# Altium PCB Controlador_BombaDeAgua(analogico).PcbDoc
Units mm, origin at the board's own origin, x right, y up, seen from the top; angles counter-clockwise.
Board outline 68.4 x 34.5 mm, 2 copper layers (Top Layer, Bottom Layer); 17 components, 9 nets, 38 pads, 0 vias.
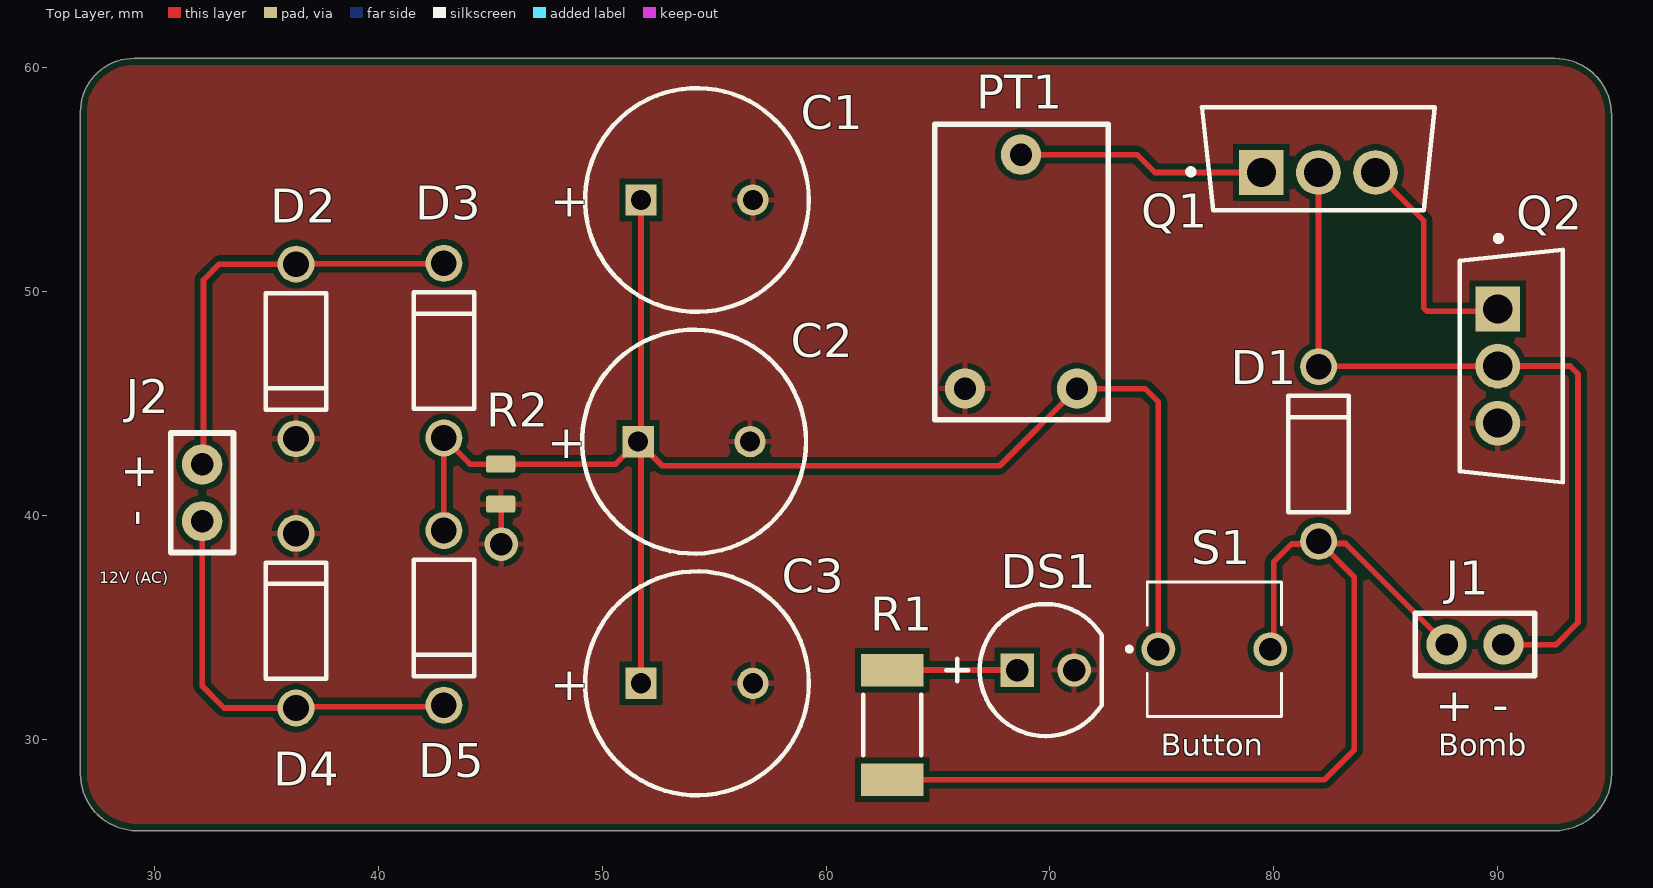
[diagram p0: Top Layer view]
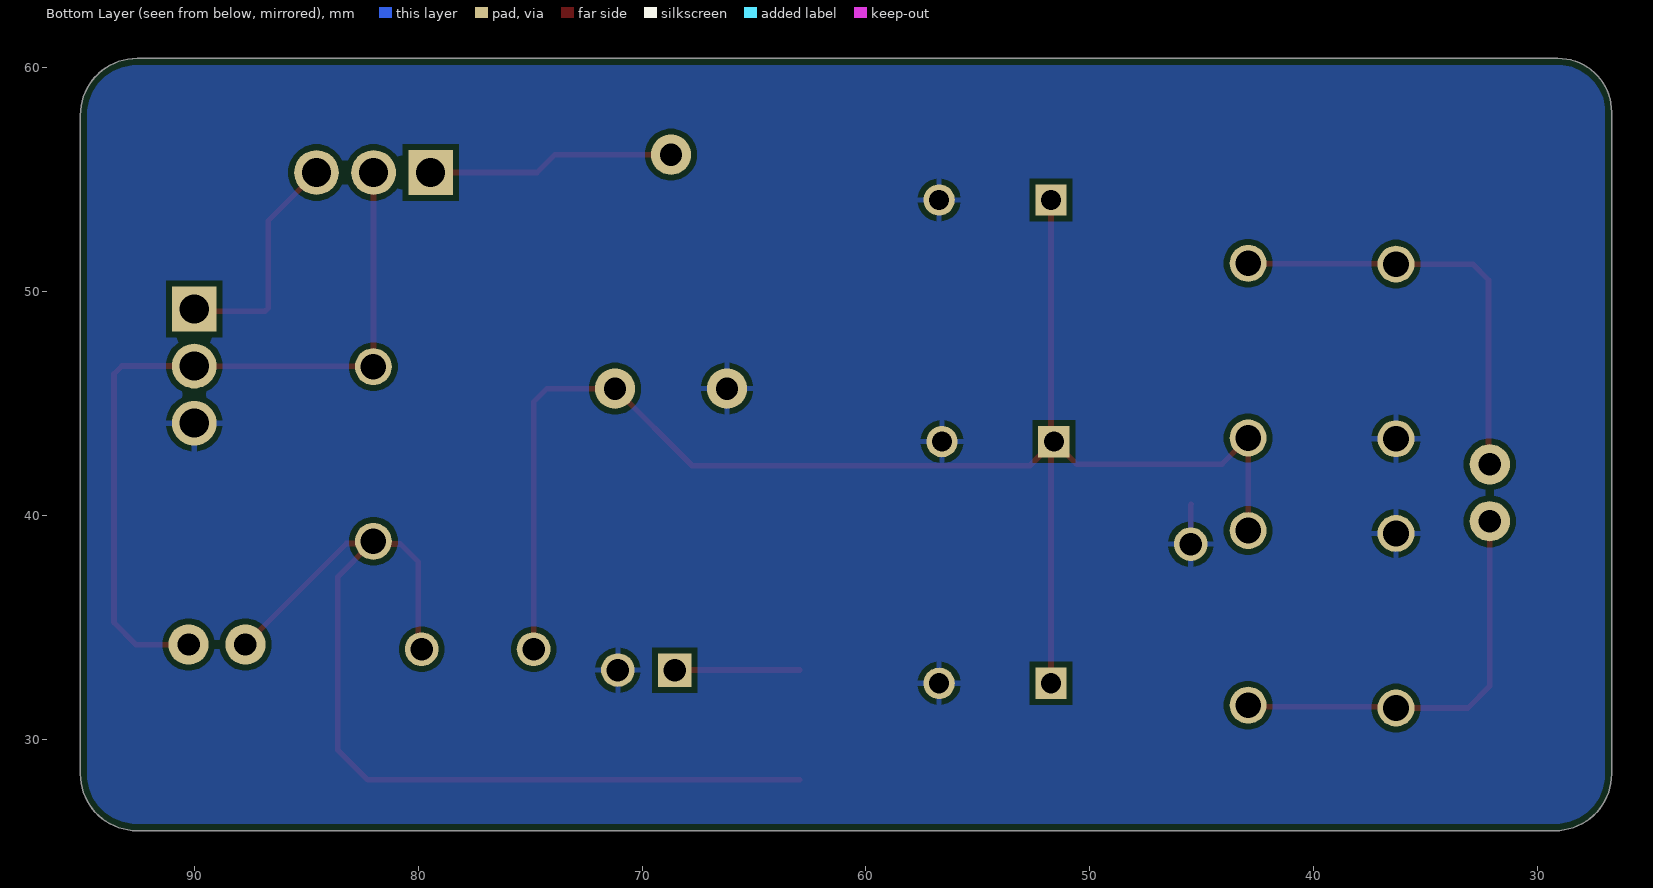
[diagram p1: Bottom Layer view, seen from below]

## Layer stack, top to bottom
Top Solder: solder mask 0.0102, Solder Resist, Dk 3.5
Top Layer: signal copper 0.0356
Dielectric 1: dielectric 0.32, FR-4, Dk 4.8
Bottom Layer: signal copper 0.0356
Bottom Solder: solder mask 0.0102, Solder Resist, Dk 3.5

## Board outline
92.549,25.927 ccw(c92.549,28.467) 95.089,28.467 95.089,57.887 ccw(c92.549,57.887) 92.549,60.427 29.089,60.427 ccw(c29.089,58.027) 26.689,58.027 26.689,28.467 ccw(c29.229,28.467) 29.229,25.927 43.289,25.927

## Design rules (kind name [scope] priority, off if disabled: settings)
BoardOutlineClearance [All] p1: gap=0.254 ignorepadtopadclearanceinfootprint=FALSE except(0: Arc-SplitContinuation Track-SplitContinuation SMDPad-SplitContinuation THPad-SplitContinuation Via-SplitContinuation Fill-SplitContinuation Poly-SplitContinuation Region-SplitContinuation Text-SplitContinuation; 0.3: Track-OutlineEdge THPad-OutlineEdge Via-OutlineEdge Poly-OutlineEdge)
Clearance [All] p1: gap=0.254 ignorepadtopadclearanceinfootprint=FALSE
PolygonConnect [All] p1: connectstyle=Relief reliefconductorwidth=0.254 reliefentries=4 polygonreliefangle="90 Angle" airgapwidth=0.254
RoutingVias [All] p1: holewidth=0.711 width=1.27 viastyle="Through Hole" minholewidth=0.711 minwidth=1.27 maxholewidth=0.711 maxwidth=1.27
SolderMaskExpansion [All] p1: expansion=0.102 istentingtop=FALSE
SupplyNets "Schematic Supply Nets" [InNet('GND')] p1: voltage=0.000
Width [All] p1: maxlimit=0.254 minlimit=0.254 preferedwidth=0.254
30 further rules are at their usual default settings.

## Components (designator, comment, footprint, x,y, rotation, side; value= is the part's Value field where it differs from the comment)
C1 "ECA1EM102" CAPPR65-500-2000X1000X2200 54.229,54.102 r0 top value=1mF
C2 "ECA1EM102" CAPPR65-500-2000X1000X2200 54.102,43.307 r0 top value=1mF
C3 "ECA1EM102" CAPPR65-500-2000X1000X2200 54.229,32.512 r0 top value=1mF
D1 "1N4007" FAIR-DO-41-2 82,42.754 r90 top
D2 "1N4007" FAIR-DO-41-2 36.322,47.334 r270 top
D3 "1N4007" FAIR-DO-41-2 42.926,47.371 r90 top
D4 "1N4007" FAIR-DO-41-2 36.322,35.306 r90 top
D5 "1N4007" FAIR-DO-41-2 42.926,35.433 r270 top
DS1 "G502DC" CGX-G502DC 69.808,33.102 r0 top
J1 "Bomba" "HEADER 2" 87.715,34.245 r0 top
J2 "Trafo" "HEADER 2" 32.131,42.291 r270 top
PT1 "Potenciômetro" "POTENCIôMETRO 10K" 71.205,45.675 r180 top
Q1 "TIP31C" FP-TO-220-P0A0015988-MFG 81.99,55.935 r90 top
Q2 "TIP31C" FP-TO-220-P0A0015988-MFG 90.609,46.681 r0 top
R1 "270R" RESC2010(5025)_M 62.95,30.652 r90 top value="270.00 Ohm"
R2 "CMP-009-00016-5" RESC0805(2012)_L 45.466,41.402 r270 top value=10k
S1 "BUTT-2" SW_BUTT-2 77.343,34.036 r0 top

## Footprints (in the part's own frame and the unit in brackets; to place one, negate y for a bottom-side part, rotate by r counter-clockwise, add the part's x,y. Pads: shape width x height; smd on the part's side, far side on the other; paste and mask are expansions set on the pad)
CAPPR65-500-2000X1000X2200 [mm] "THD, 2-Leads, Dia 10mm, Pin Spacing 5mm"
  rect 1.4x1.4 hole 0.9: 1(-2.5,0)
  round 1.4 hole 0.9: 2(2.5,0)
  silkscreen extent -5,-5 5,5, body extent -5,-5 4.95,5, height 22
CGX-G502DC [mm] "THD, 2-Leads, Dia 5.9mm, Pin Spacing 2.54mm"
  rect 1.5x1.5 hole 1: 1(-1.27,0)
  round 1.5 hole 1: 2(1.27,0)
  silkscreen extent -4.45,-2.95 2.5,2.95, body extent -2.95,-2.95 2.5,2.95, height 9.1
FAIR-DO-41-2 [mm] "THD, 2-Leads, Body 5.2x2.72mm, Pin Spacing 7.8mm"
  round 1.65 hole 1.15: 1(-3.9,0) 2(3.9,0)
  silkscreen extent -2.6,-1.35 2.6,1.35, body extent -4.29,-1.17 4.29,1.17, height 2.35
FP-TO-220-P0A0015988-MFG [mm]
  rect 2x2 hole 1.3 paste-2539.97 mask+0: 1(-0.607,2.55)
  round 2 hole 1.3 paste-2539.97 mask+0: 2(-0.607,0) 3(-0.607,-2.55)
  silkscreen extent -2.3,-5.2 2.3,5.82, body extent -2.4,-5.3 2.4,5.3, height 0.25
"HEADER 2" [mm]
  round 1.8 hole 1: 0(0,0) 1(2.54,0)
  silkscreen extent -1.4,-1.4 3.94,1.4, body extent -1.27,-1.27 3.81,1.27, height 8.89
"POTENCIôMETRO 10K" [mm]
  round 1.8 hole 1: 1(0,0) 2(5,0) 3(2.5,-10.452)
  silkscreen extent -1.4,-11.81 6.35,1.4, body extent -2.03,-10.63 6.97,1.27, height 6.55
RESC0805(2012)_L [mm] "Chip Resistor, Body 2.0x1.3mm, IPC High Density"
  rrect25% 0.76x1.3 smd: 1(-0.9,0) 2(0.89,0)
  body extent -1,-0.62 1,0.63, height 0.6
RESC2010(5025)_M [mm] "Chip Resistor, Body 5.0x2.5mm, IPC Low Density"
  rect 1.45x2.8 smd: 1(-2.45,0) 2(2.45,0)
  silkscreen extent -1.35,-1.3 1.35,1.3, body extent -2.6,-1.35 2.6,1.35, height 0.71
SW_BUTT-2 [mm]
  round 1.508 hole 1: 1(-2.5,0) 2(2.5,0)
  silkscreen extent -3.9,-3 3,3

## Part data
C1 C2 C3: library part CMP-001-00023-8, "Aluminum Electrolytic Capacitor, 1000 uF, +/- 20%, 25 V, -40 to 85 degC, 2-Pin THD, RoHS, Bulk", Capacitor Type=Electrolytic, Case/Package=Radial, Manufacturer=Panasonic, Max Operating Temperature=85°C, Min Operating Temperature=-40°C, Package Description="2-Pin Radial Lead, Dia 10 mm, Height 22 mm", Package Quantity=200, Package Reference=CAPPR65-500-2000X1000X2200, Ripple Current=850mA, Tolerance=20%, Voltage Rating=25V, Datasheet URL=https://industrial.panasonic.com/cdbs/www-data/pdf/RDF0000/ABA0000C1218.pdf, Datasheet Version="Rev. 05, 10/2016", Diameter=10mm, Lead Pitch=5mm, Manufacturer URL=http://www.panasonic.com/, Mounting Technology=TH, Packaging=Bulk, RoHS Compliant=True
D1 D2 D3 D4 D5: library part CMP-004-00007-2, "General Purpose Rectifier, 1.1 V, 1.0 A, -55 to 175 degC, 2-Pin DO-41, RoHS, Tape and Reel", Case/Package=DO-41-2, Forward Current=1A, Forward Voltage=1.1V, Manufacturer=Fairchild, Max Operating Temperature=175°C, Max Surge Current=30A, Min Operating Temperature=-55°C, Package Description="2-Pin Axial Lead, Dia 2.375 mm, Body Length 4.63 mm", Package Quantity=5000, Package Version="Rev. 2, 09/2008", Peak Reverse Current=5uA, Datasheet URL=https://www.fairchildsemi.com/datasheets/1N/1N4007.pdf, Datasheet Version="Rev. 1.1.0, 11/2014", Elements=1, Manufacturer URL=https://www.fairchildsemi.com/, Mounting Technology=TH, Package Reference=DO-41-2, Package URL=http://www.fairchildsemi.com/dwg/DO/DO41A.pdf, Packaging=TapeandReel, Pins=2, RoHS Compliant=True
DS1: library part CMP-007-00008-2, "Green LED, 80 mW, 20 mA, -25 to 85 degC, 2-Pin THD", Manufacturer="Shenzhen CGX", Package Description="2-Pin Through Hole Device, Dia 5.9 mm", Case/Package=G502DC, Datasheet URL=http://datasheet.octopart.com/G502DC-Chengguangxing-datasheet-62330340.pdf, Datasheet Version=Sep-14, Manufacturer URL=http://szcgx.com/, Mounting Technology=TH, Package Reference=G502DC, RoHS Compliant=Unknown
J1 J2: library part CMP-040-000034-1, Design Item ID="Header 2", Source=FIFILIB.SchLib
PT1: library part CMP-040-000215-1, Design Item ID=Potenciômetro, Source=TROIA2.2.SchLib
Q1 Q2: library part CMP-12195-000001-1, "TRANS NPN 100V 3A TO-220", Collector Base Voltage=100V, Collector Emitter Saturation Voltage=1.2V, Emitter Base Voltage=5V, Manufacturer=STMicroelectronics, Max Collector Current=3A, Max Junction Temp=+150°C, Package=TO-220-P0A0015988, Power Dissipation=2W, Temperature="to +150°C", Automotive=No, Category=Trans, Collector Emitter Voltage=100V, ComponentLink2Description=Datasheet, ComponentLink2URL=https://www.st.com/resource/en/datasheet/tip31c.pdf, Device Class L1="Discrete Semiconductors", Device Class L2=Transistors, Device Class L3=BJTs, Digikey Description="TRANS NPN 100V 3A TO-220", Height=19.68mm, Hfe Max=50, hFE Min=10, Hfe Testic=3A, Hfe Testvce=4V, Lead Free=Yes, Manufacturer Part Number=TIP31C, Mouser Description="Bipolar Transistors - BJT NPN Gen Pur Power", Number Of Elements=1, Number Of Npn=1, Octopart=https://octopart.com/tip31c-stmicroelectronics-15555, RoHS=TRUE, Standoff Height=3.5mm, Temperature Range High=+150°C
R1: library part CMP-1017-00444-1, "270R 0.75W 1% 2010 (5025 Metric)  SMD", Case-EIA=2010, Case-Metric=5025, Power="0.75 W", Tolerance="1 %", Technology=SMT
R2: library part CMP-009-00318-1, "Chip Resistor, 10 KOhm, +/- 1%, 0.25 W, -55 to 155 degC, 1206 (3216 Metric)", Case/Package=1206, Max Operating Temperature=155°C, Min Operating Temperature=-55°C, Power=250mW, Tolerance=1%, Voltage Rating=200V, Available Preview Images=2D, Design Item ID=CMP-009-00016-5, Mounting Technology=SM, Pins=2, RoHS Compliant=True, Source="Components - 14.12.25 - 13.59.SchLib"
S1: library part CMP-011-00029-1, "Tactile Switches MINI PUSH BUTTON SWITCH 2-PIN QTY. 4", Case/Package=None, Availability="In Stock", Check_prices=https://www.snapeda.com/parts/BUTT-2/Gravitech/view-part/?ref=eda, Component Type=Standard, Design Item ID=BUTT-2, MF=Gravitech, MP=BUTT-2, Pins=2, Price=None, Purchase-URL=https://pricing.snapeda.com/search/part/BUTT-2/?ref=eda, SnapEDA_Link=https://www.snapeda.com/parts/BUTT-2/Gravitech/view-part/?ref=snap, Source=BUTT-2.SchLib

## Free pads (board coordinates)
  round 1.5 hole 1: ""(45.489,38.727)

## Nets (pads, with @x,y where several pads share a name; then routed paths per layer and width w, separated by ;. In a path a pad name is that pad's centre, name@x,y a point inside that pad or via, vN(x,y) a via of type N, cw(c..) or ccw(c..) an arc to the next point about the centre after c; other vN are vias at no path point)
GND: C1.2 C2.2 C3.2 D2.2 D4.2 DS1.2 pad. PT1.2 Q2.3 R2.2 | length 1.7
  Top Layer w0.254: R2.2 45.489,40.489 pad.@45.489,38.827
NetC1_1: C1.1 C2.1 C3.1 D3.1 D5.1 PT1.1 R2.1 S1.1 | length 71.6
  Top Layer w0.254: D5.1 D3.1 44.095,42.302 R2.1 50.597,42.302 C2.1 ; C3.1 C2.1@51.729,43.18 ; C1.1 51.729,43.434 C2.1 ; S1.1 74.843,45.073 74.241,45.675 PT1.1 67.756,42.226 52.683,42.226 C2.1@51.729,43.18 ; C2.1 C2.1@51.729,43.18
NetD1_1: D1.1 J1.0 R1.1 S1.2 | length 44.8
  Top Layer w0.254: R1.1 82.264,28.202 83.589,29.527 83.589,37.265 D1.1@82.1,38.754 ; S1.2 79.989,34.182 79.989,37.927 80.794,38.732 D1.1@81.878,38.732 ; D1.1 D1.1@82.1,38.754 ; J1.0 83.206,38.754 D1.1@82.1,38.754
NetD1_2: D1.2 J1.1 Q1.2 Q2.2 | length 35.3
  Top Layer w0.254: Q1.2 81.995,55.322 81.995,46.659 D1.2 82.014,46.668 89.988,46.668 Q2.2 93.235,46.681 93.589,46.327 93.589,35.227 92.589,34.227 90.273,34.227 J1.1
NetD2_1: D2.1 D3.2 J2.0 | length 19.3
  Top Layer w0.254: J2.0 32.189,42.349 32.189,50.527 32.896,51.234 D2.1 36.34,51.252 42.907,51.252 D3.2
NetD4_1: D4.1 D5.2 J2.1 | length 18.6
  Top Layer w0.254: J2.1 32.131,32.385 33.11,31.406 D4.1 36.386,31.47 42.862,31.47 D5.2
NetDS1_1: DS1.1 R1.2 | length 5.6
  Top Layer w0.254: R1.2 DS1.1
NetPT1_3: PT1.3 Q1.1 | length 11.1
  Top Layer w0.254: PT1.3 73.889,56.127 74.689,55.327 Q1.1
NetQ1_3: Q1.3 Q2.1 | length 10.4
  Top Layer w0.254: Q1.3 86.689,53.178 86.689,49.276 86.838,49.127 89.897,49.127 Q2.1

## Polygon pours and split planes (outlines as drawn)
GND on Bottom Layer "GND_L02_P003" (solid, remove dead copper, pour order 3): 93.889,60.727 cw(c93.889,59.227) 95.389,59.227 95.389,27.227 cw(c93.789,27.227) 93.789,25.627 93.489,25.654 27.686,25.654 cw(c27.686,26.924) 26.416,26.924 26.416,58.627 26.389,59.327 cw(c27.789,59.327) 27.789,60.727
GND on Top Layer "GND_L01_P002" (solid, remove dead copper, pour order 2): 93.889,60.727 cw(c93.889,59.227) 95.389,59.227 95.389,27.227 cw(c93.789,27.227) 93.789,25.627 93.489,25.654 27.686,25.654 cw(c27.686,26.924) 26.416,26.924 26.416,58.627 26.389,59.327 cw(c27.789,59.327) 27.789,60.727

## Silkscreen, mask and mechanical layers (free items; w line width, h text height)
Top Overlay:
  text "12V (AC)" at 27.543,36.981 h0.5
  text "Button" at 74.943,29.281 h1
  text "Bomb" at 87.343,29.281 h1

## Text inside footprints (layer, text, board x,y; h text height)
C1: Top Overlay "+" at 47.679,53.352 h1.5
C2: Top Overlay "+" at 47.552,42.557 h1.5
C3: Top Overlay "+" at 47.679,31.762 h1.5
J1: Top Overlay "-" at 89.747,30.816 h1.5; Top Overlay "+" at 87.207,30.816 h1.5
J2: Top Overlay "+" at 28.702,42.799 h1.5 r270; Top Overlay "-" at 28.702,40.259 h1.5 r270